# Altium PCB PI5_Robo_Board_PCB.PcbDoc (part 1 of 3)
Units mm, origin at the board's own origin, x right, y up, seen from the top; angles counter-clockwise.
Board outline 98.8 x 131.2 mm, 4 copper layers (TOP1, SIG2, SIG3, BOT4), stack 1.399 mm thick; 219 components, 149 nets, 779 pads, 462 vias.
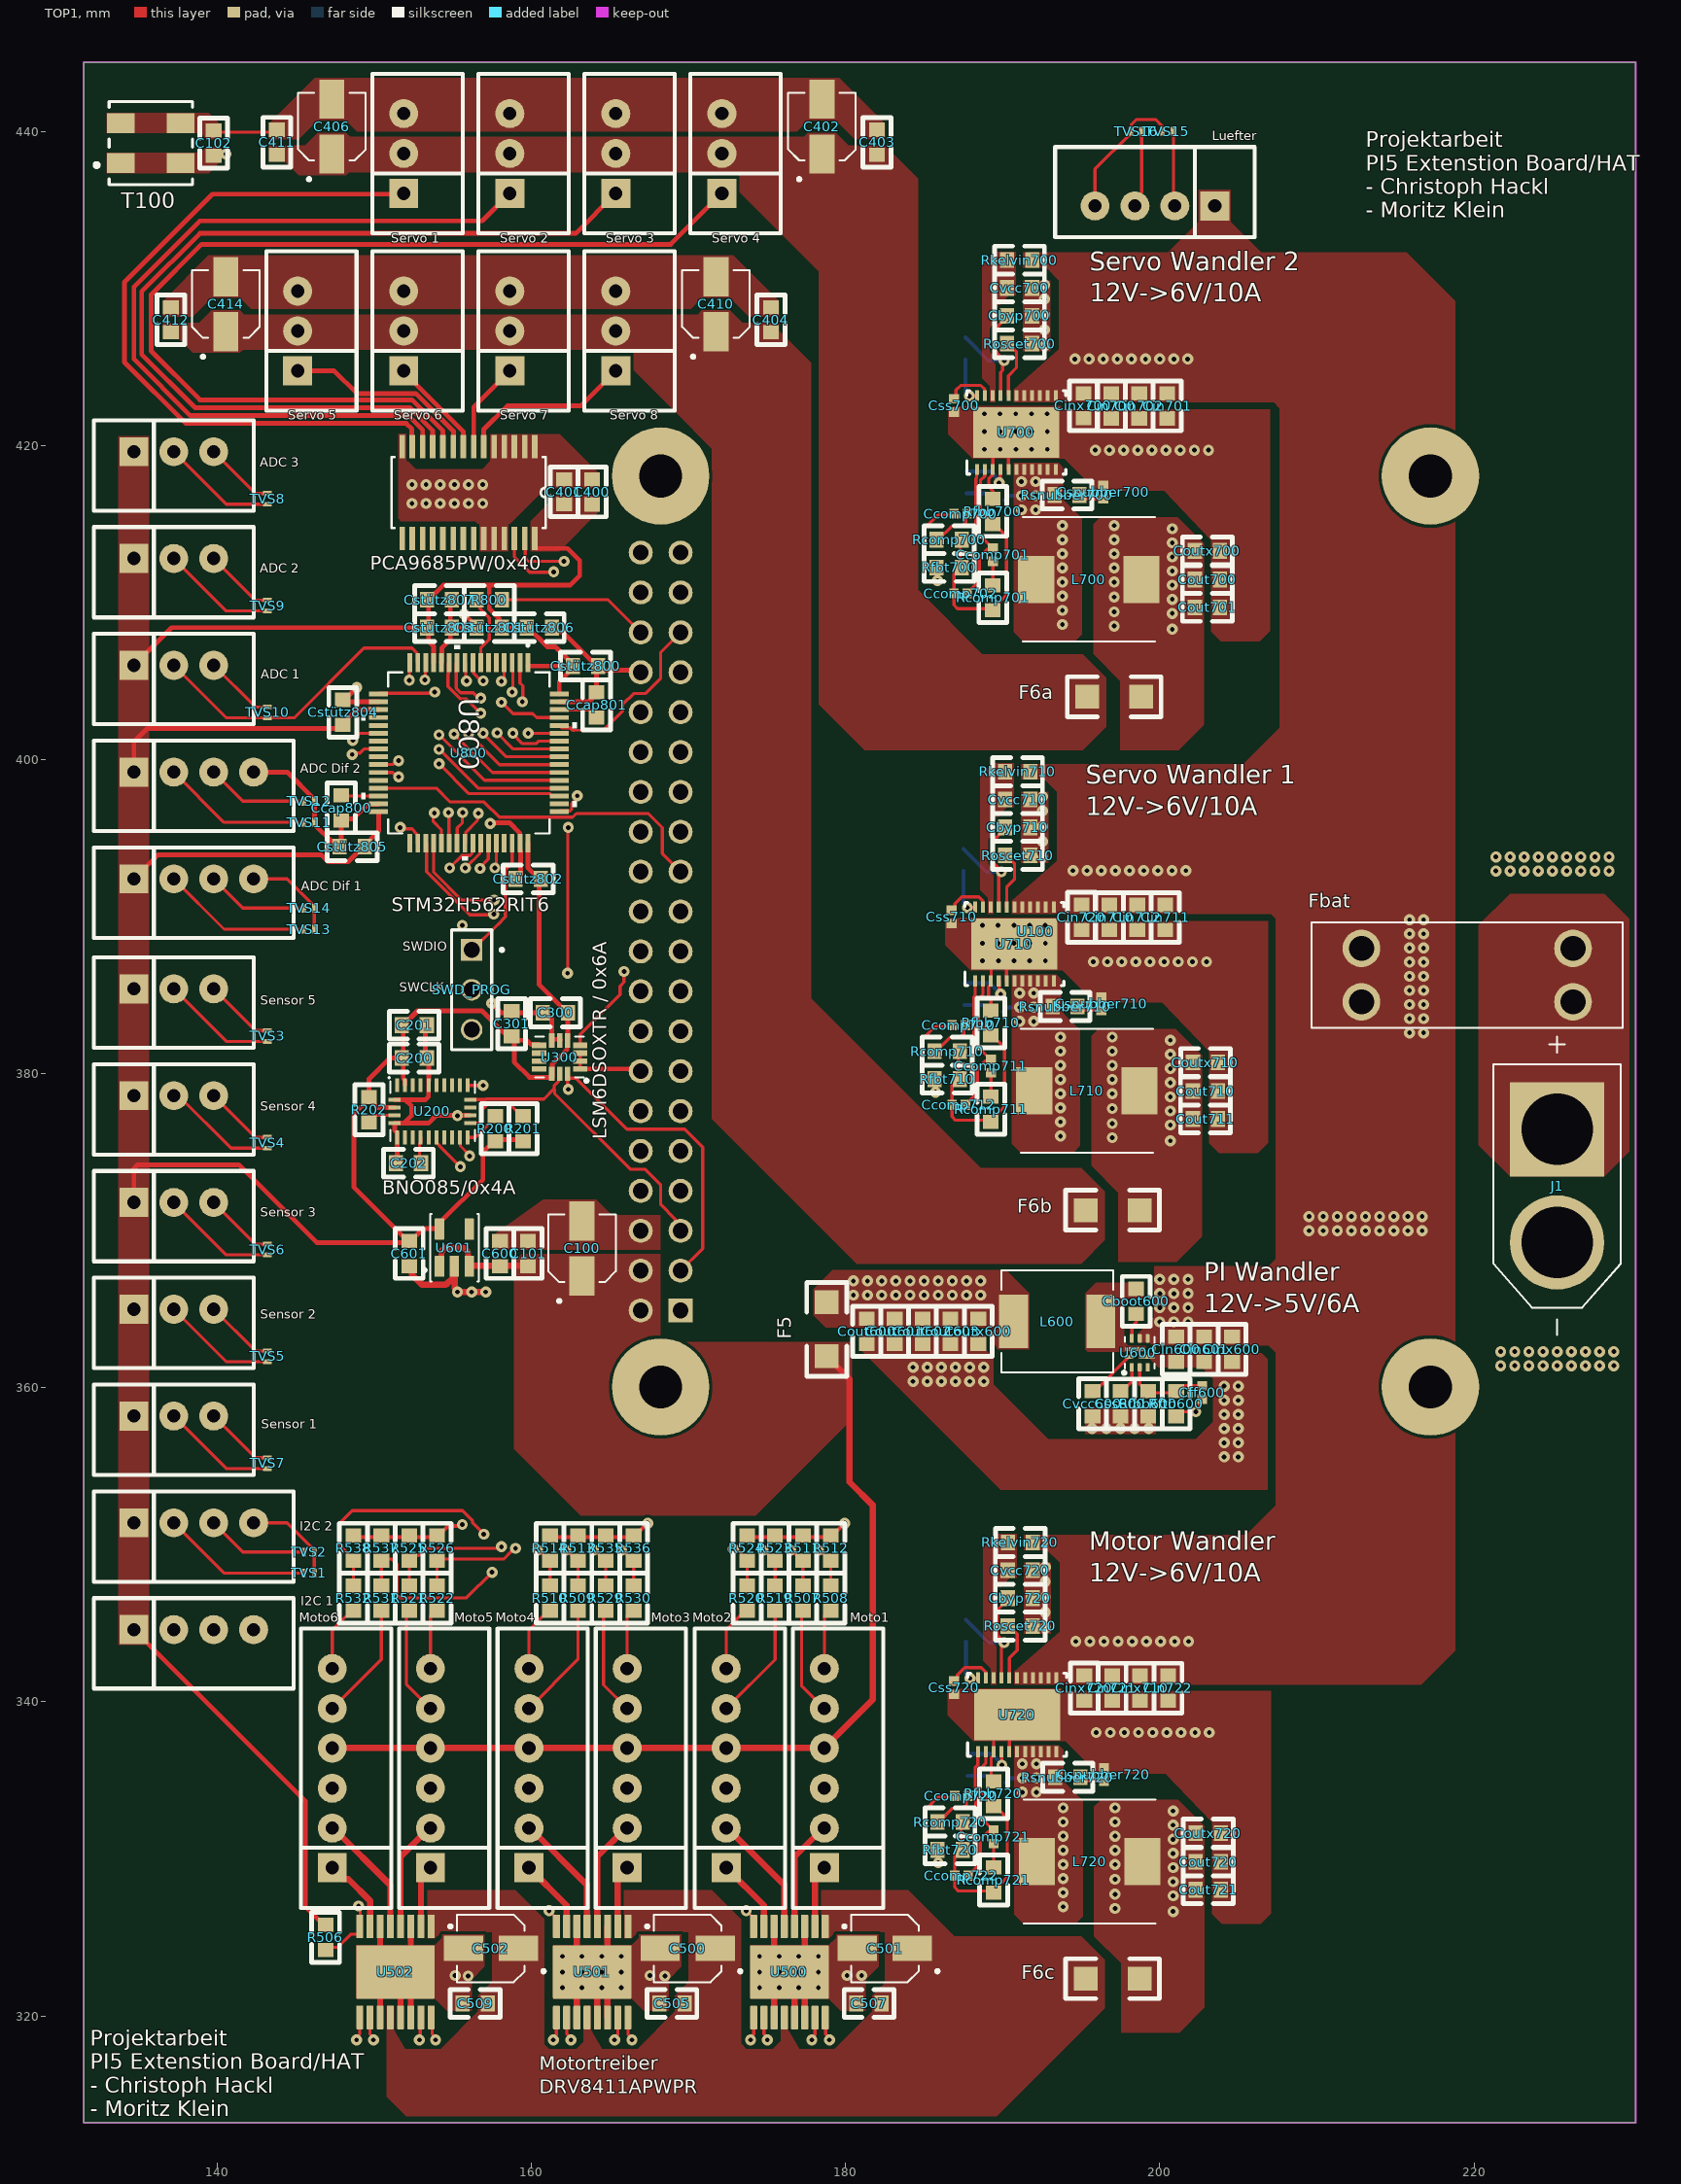
[diagram p0: TOP1 view]
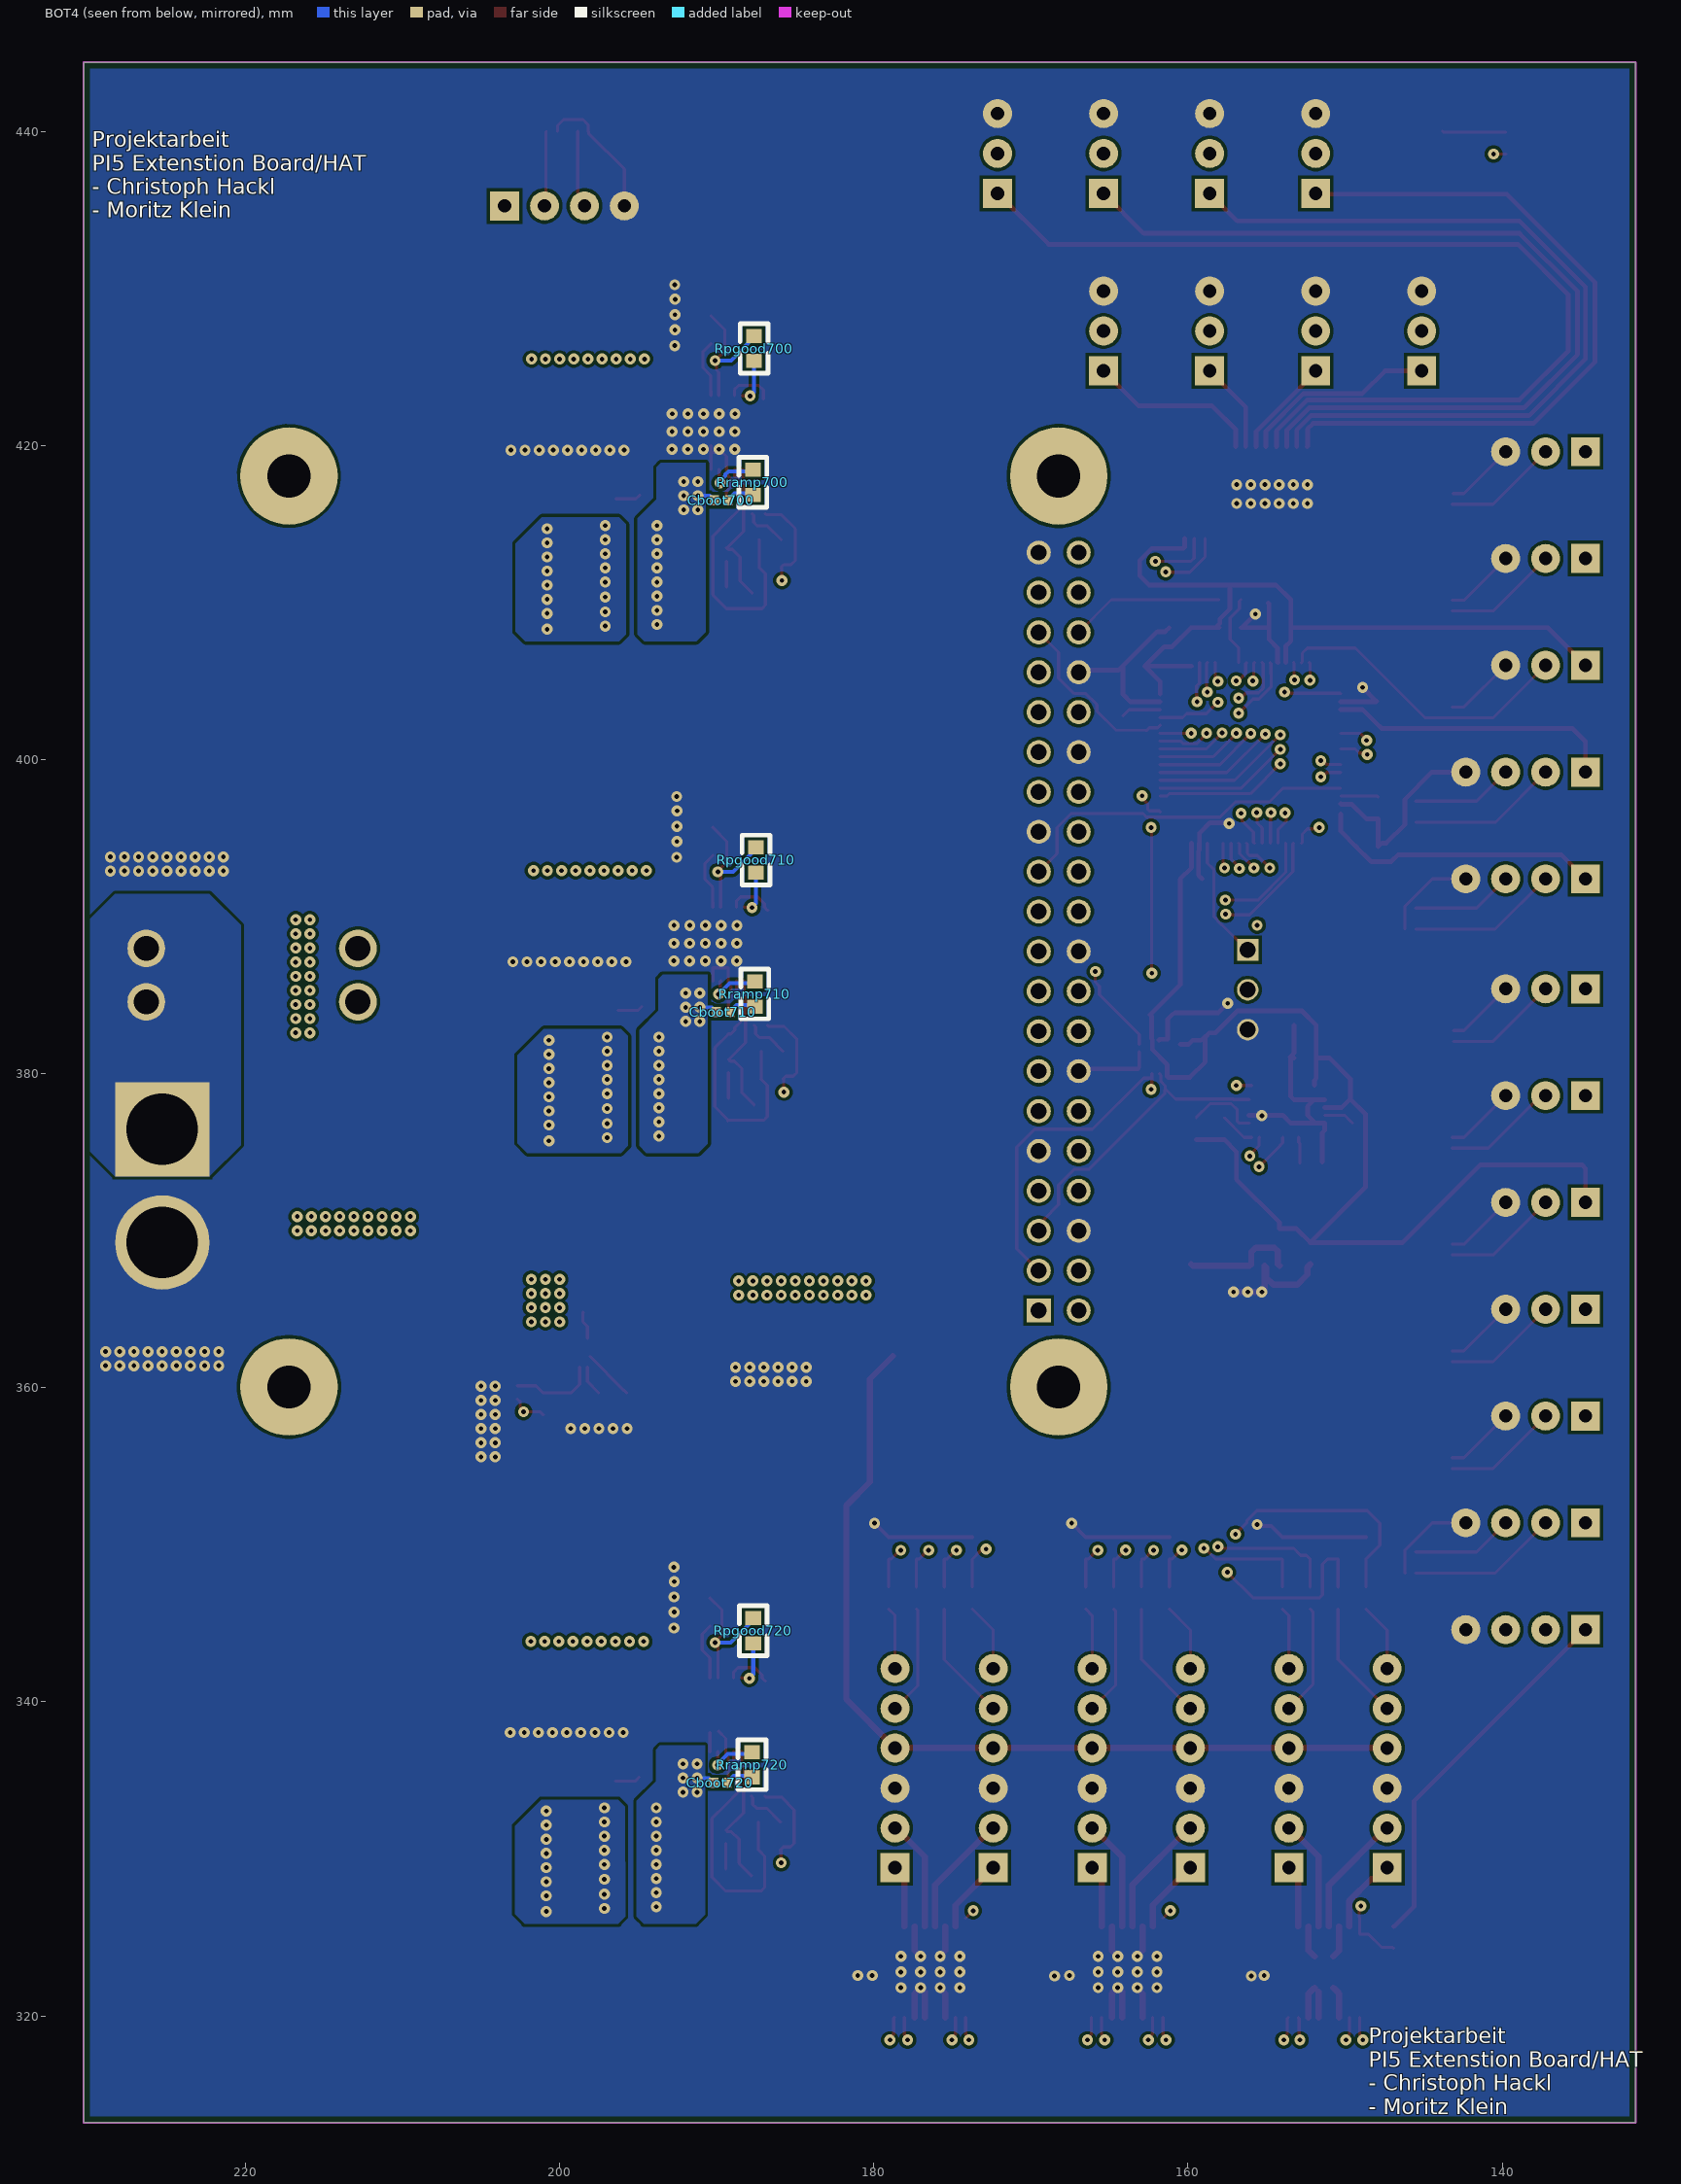
[diagram p1: BOT4 view, seen from below]
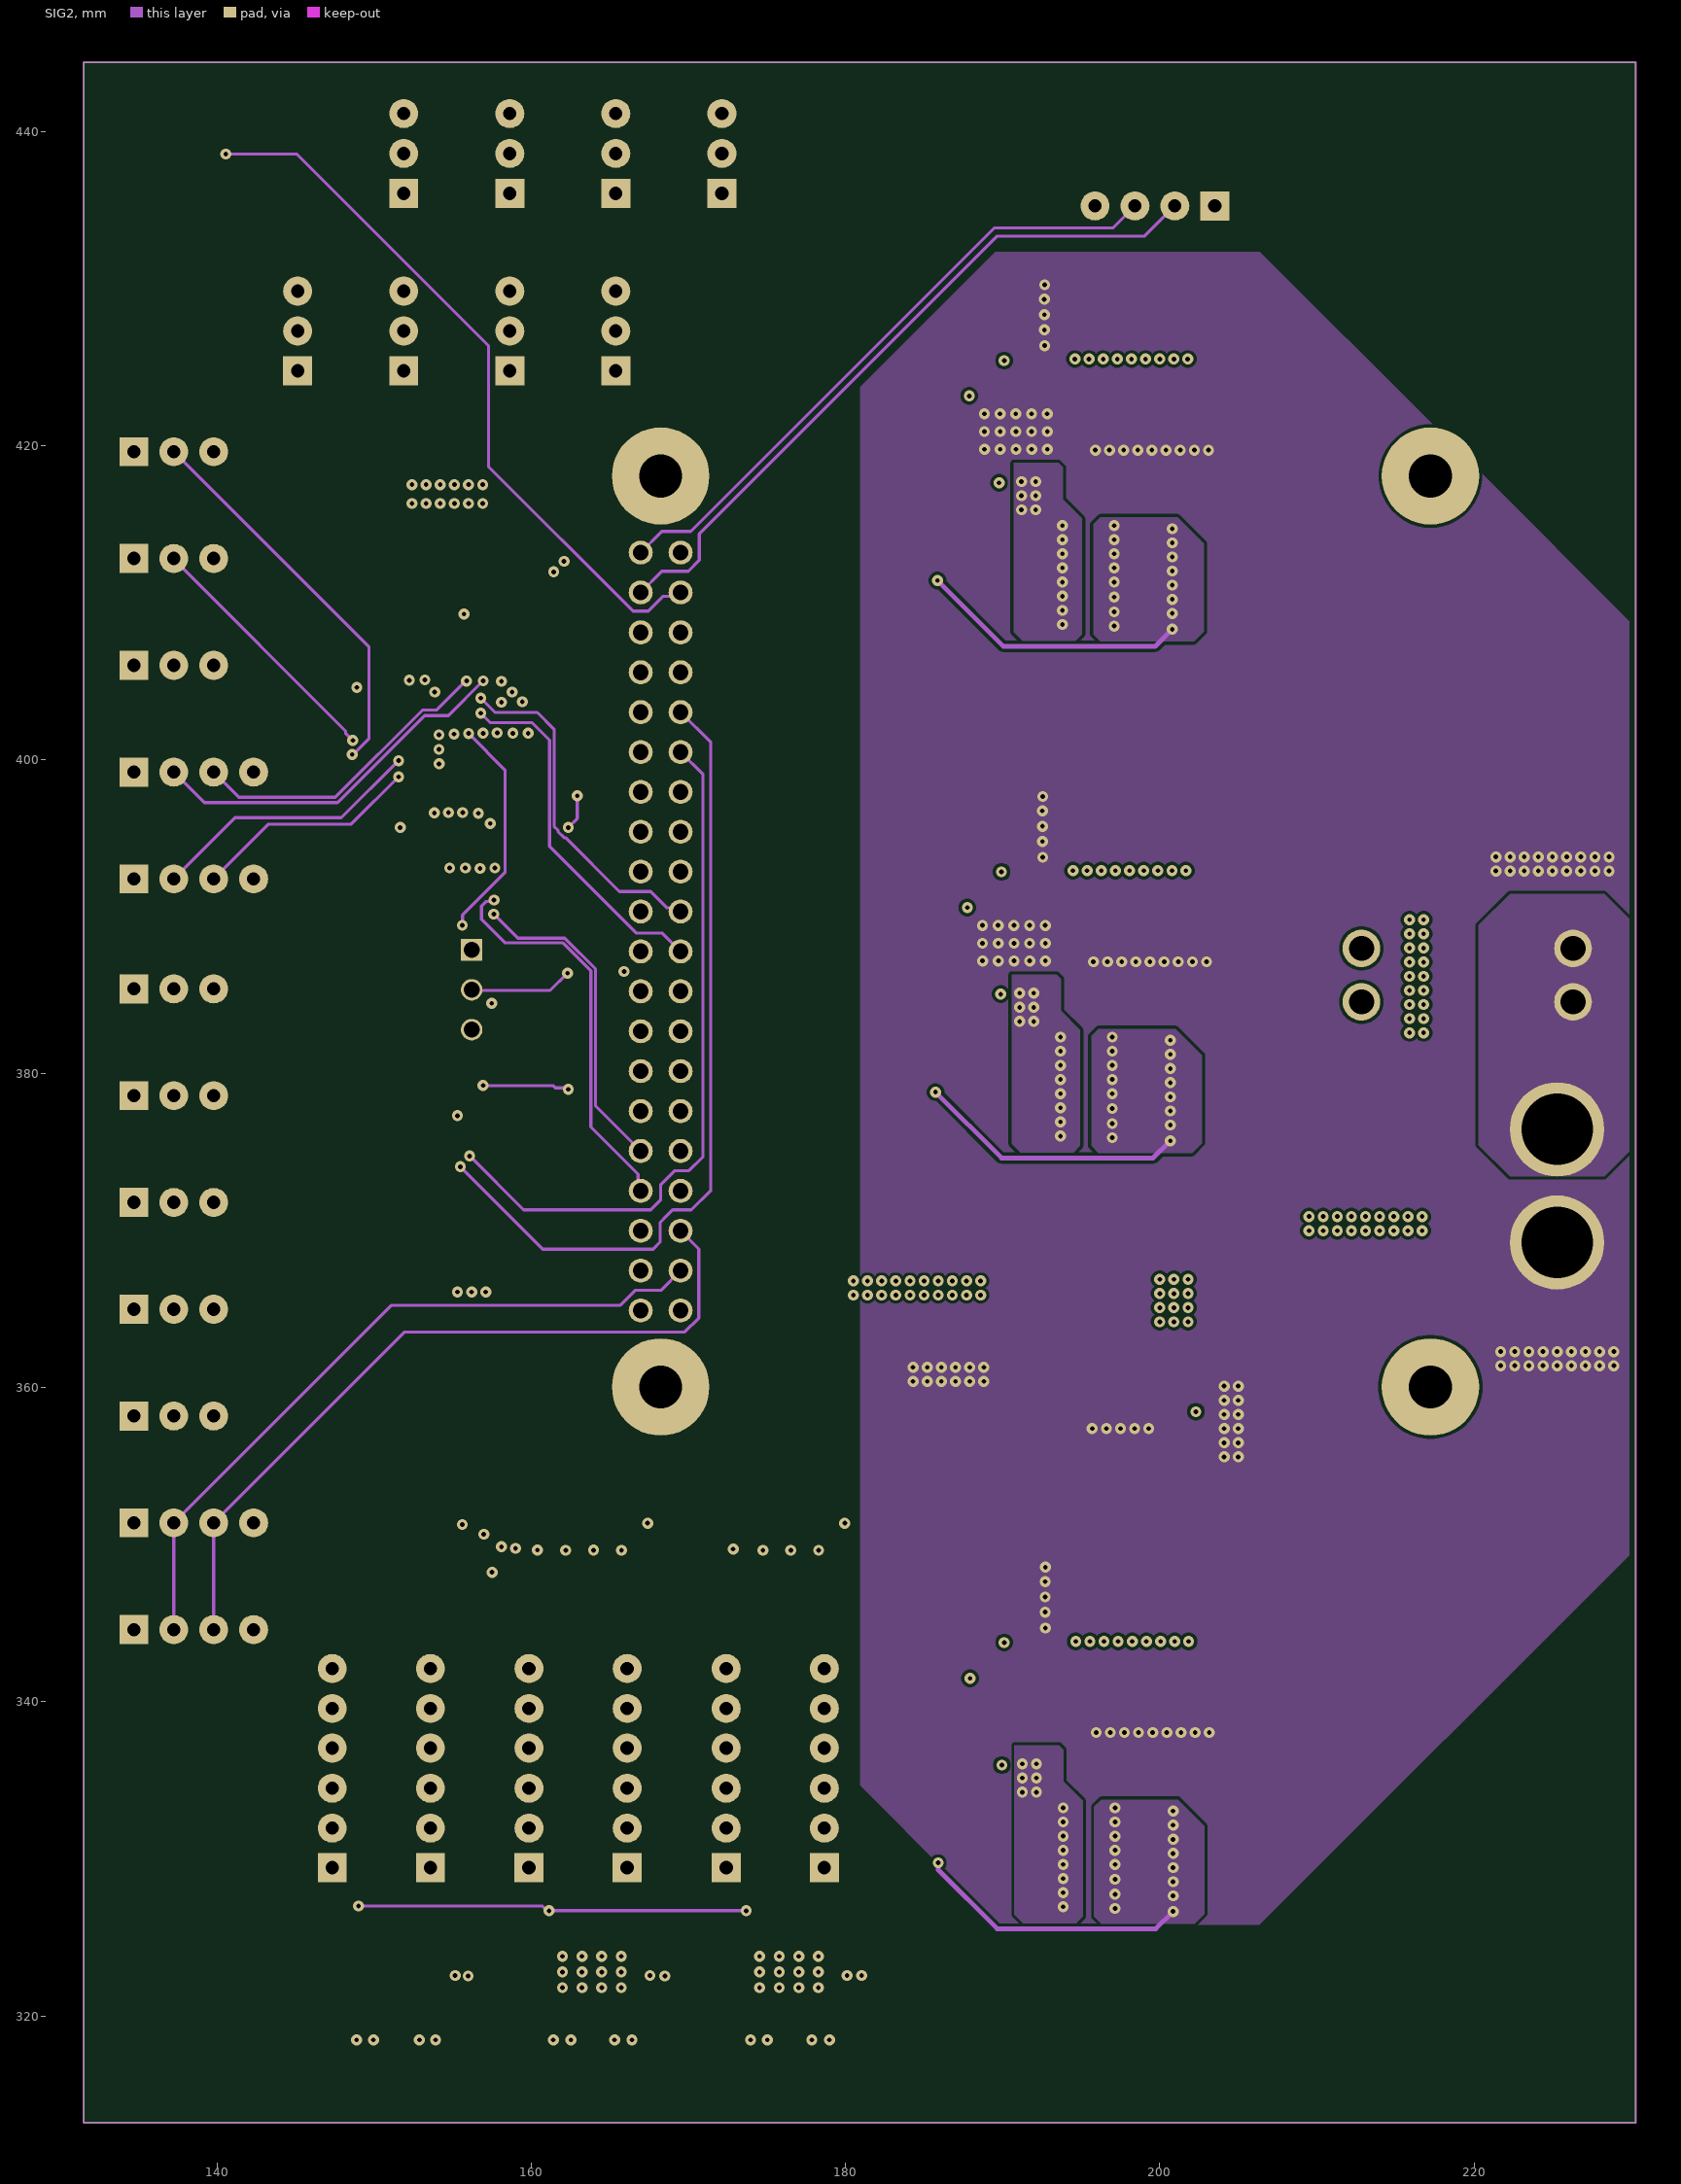
[diagram p2: SIG2]
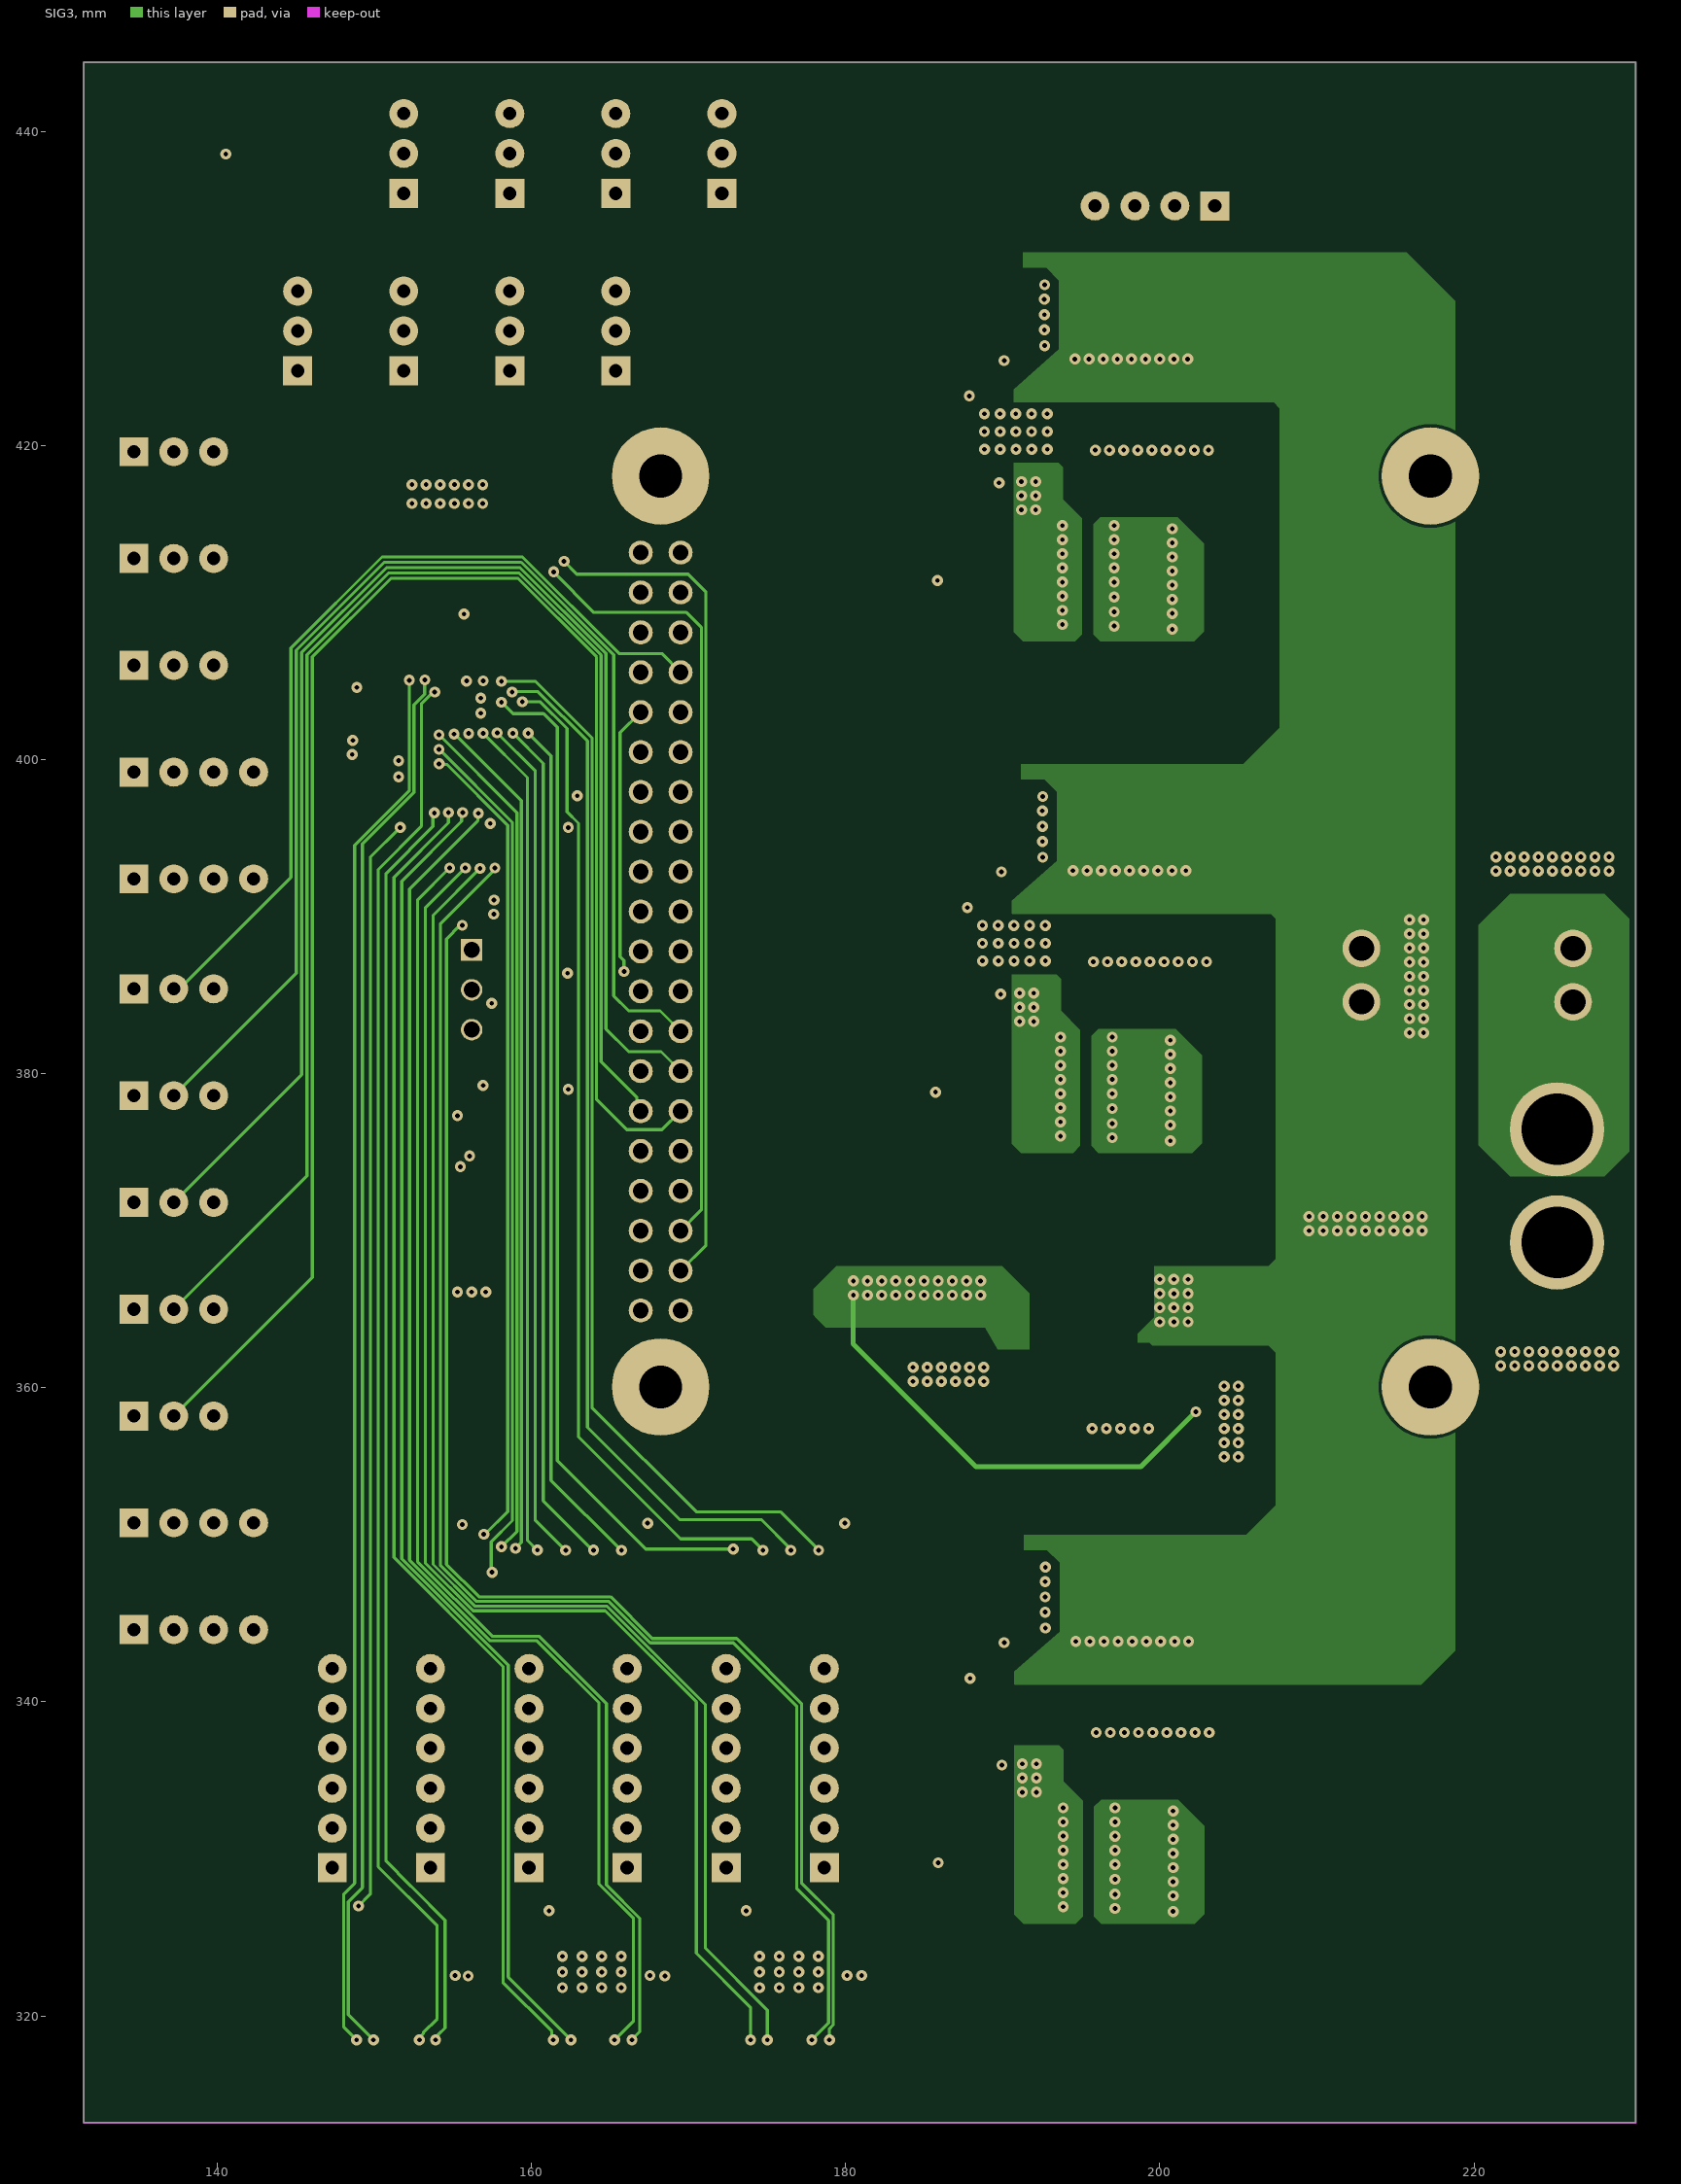
[diagram p3: SIG3]

## Layer stack, top to bottom
Top Solder: solder mask 0.0102, Solder Resist, Dk 3.5
TOP1: signal copper 0.035
Dielectric 1: prepreg 0.1168, PP-016, Dk 4.4
SIG2: signal copper 0.0152
Core: core 1.065, Core-042, Dk 4.6
SIG3: signal copper 0.0152
Dielectric 2: prepreg 0.1168, PP-016, Dk 4.4
BOT4: signal copper 0.035
Bottom Solder: solder mask 0.0102, Solder Resist, Dk 3.5

## Board outline
131.5,313.2 230.3,313.2 230.3,444.4 131.5,444.4

## Design rules (kind name [scope] priority, off if disabled: settings)
BoardOutlineClearance [All] p1: gap=0.4 ignorepadtopadclearanceinfootprint=FALSE
Clearance [All] p1: gap=0.2 ignorepadtopadclearanceinfootprint=FALSE except(0.09: Arc-Arc Arc-Track Track-Track; 0.1: Arc-SMDPad Track-SMDPad SMDPad-THPad THPad-THPad; 0.15: SMDPad-SMDPad; 0.25: Arc-Hole Track-Hole SMDPad-Hole Via-Hole Fill-Hole Poly-Hole Region-Hole Text-Hole; 0.3: Arc-THPad Track-THPad; 0.45: THPad-Hole)
ComponentClearance [All] p1 off: gap=0.089 collisioncheckmode=3 verticalgap=0.089 showdistances=TRUE
DiffPairsRouting [All] p1: maxlimit=0.1 minlimit=0.1 mostfreqgap=0.1 toplayer_minwidth=0.1 toplayer_maxwidth=1816.048 toplayer_prefwidth=0.1 midlayer1_minwidth=0.1 midlayer1_maxwidth=1816.048 midlayer1_prefwidth=0.1 midlayer2_minwidth=0.1 midlayer2_maxwidth=1816.048 midlayer2_prefwidth=0.1 bottomlayer_minwidth=0.1 bottomlayer_maxwidth=1816.048 bottomlayer_prefwidth=0.1 maxuncoupledlength=12.7
Height [All] p1: minheight=0 maxheight=1816.048 prefheight=12.7
HoleSize [All] p1: absolutevalues=TRUE maxlimit=6.3 minlimit=0.15 maxpercent=80.000 minpercent=20.000
HoleToHoleClearance [All] p1: gap=0.45 allowstackedmicrovias=FALSE
MinimumAnnularRing [All] p1: minimumring=0.2
MinimumSolderMaskSliver [All] p1: minsoldermaskwidth=0.1
PlaneClearance [All] p1: clearance=0.089
PlaneConnect PlaneConnectPowerPads [InPadClass('PowerPads')] p1: planeconnectstyle=Direct reliefexpansion=0.508 reliefentries=4 reliefconductorwidth=0.254 reliefairgap=0.254
PlaneConnect [All] p2: pad.planeconnectstyle=Relief pad.reliefexpansion=0.3 pad.reliefentries=4 pad.reliefconductorwidth=0.089 pad.reliefairgap=0.089 via.planeconnectstyle=Direct via.reliefexpansion=0.3 via.reliefentries=4 via.reliefconductorwidth=0.127 via.reliefairgap=0.127
PolygonConnect PolygonConnectPowerPads [All vs (InPadClass('PowerPads'))] p1: connectstyle=Direct reliefconductorwidth=0.254 reliefentries=4 polygonreliefangle="90 Angle" airgapwidth=0.254
PolygonConnect [All] p2: connectstyle=Direct reliefconductorwidth=0.089 reliefentries=4 polygonreliefangle="90 Angle" airgapwidth=0.089
RoutingVias [All] p1: holewidth=0.3 width=0.45 viastyle="Through Hole" minholewidth=0.3 minwidth=0.45 maxholewidth=6.3 maxwidth=6.55
SilkToSilkClearance [All] p1 off: silktosilkclearance=0
SilkToSolderMaskClearance [IsPad] p1: minsilkscreentomaskgap=0.15 clearancetoexposedcopper=TRUE
SolderMaskExpansion [All] p1: expansion=0.075 istentingtop=FALSE
SupplyNets "Schematic Supply Nets_5" [InNet('+6a')] p1: voltage=0.000
SupplyNets "Schematic Supply Nets_4" [InNet('GND')] p2: voltage=0.000
SupplyNets "Schematic Supply Nets_3" [InNet('+3.3')] p3: voltage=0.000
SupplyNets "Schematic Supply Nets_2" [InNet('+6b')] p4: voltage=0.000
SupplyNets "Schematic Supply Nets_1" [InNet('+5')] p5: voltage=0.000
SupplyNets "Schematic Supply Nets" [InNet('+6c')] p6: voltage=0.000
UnRoutedNet [All] p1: checkbadconnections=TRUE
Width [All] p1: maxlimit=1816.048 minlimit=0.09 preferedwidth=0.1
19 further rules are at their usual default settings.

## Classes and differential pairs
component class LSM6DSO: C300 C301 U300
component class BNO085: C200 C201 C202 R200 R201 R202 U200
component class Test_Sensor_Connectoren: "ADC 1" "ADC 2" "ADC 3" "ADC Dif 1" "ADC Dif 2" "ADC Diff 1" "ADC Diff 2" "ADC Sens 1" "ADC Sens 2" "ADC Sens 3" "DIG Sens 1" "DIG Sens 2" "DIG Sens 3" "DIG Sens 4" "I2C 1" "I2C 2" "Light Sensor" Luefter "Sensor 1" "Sensor 2" "Sensor 3" "Sensor 4" "Sensor 5" TVS1 TVS2 TVS3 TVS4 TVS5 TVS6 TVS7 TVS8 TVS9 TVS10 TVS11 TVS12 TVS13 TVS14 TVS15 TVS16
component class STM32: Ccap800 Ccap801 Cstütz800 Cstütz801 Cstütz802 Cstütz803 Cstütz804 Cstütz805 Cstütz806 Cstütz807 R800 SWD_PROG U800
component class Raspberry_PI5: C100 C101 C102 T100 U100
component class PCA9685: C400 C401 C402 C403 C404 C406 C410 C411 C412 C414 PCA9685PW/0x40 PCA/0x40 "Servo 1" "Servo 2" "Servo 3" "Servo 4" "Servo 5" "Servo 6" "Servo 7" "Servo 8"
component class DRV+Motor: C500 C501 C502 C505 C507 C509 Moto1 Moto2 Moto3 Moto4 Moto5 Moto6 R506 R507 R508 R509 R510 R511 R512 R513 R514 R519 R520 R521 R522 R523 R524 R525 R526 R529 R530 R531 R532 R535 R536 R537 R538 U500 U501 U502
component class 6b,_6c: Cboot710 Cboot720 Cbyp710 Cbyp720 Ccomp710 Ccomp711 Ccomp712 Ccomp720 Ccomp721 Ccomp722 Cin710 Cin711 Cin712 Cin720 Cin721 Cin722 Cinx710 Cinx720 Cout710 Cout711 Cout720 Cout721 Coutx710 Coutx720 Csnubber710 Csnubber720 Css710 Css720 Cvcc710 Cvcc720 F6b F6c L710 L720 Rcomp710 Rcomp711 Rcomp720 Rcomp721 Rfbb710 Rfbb720 Rfbt710 Rfbt720 Rkelvin710 Rkelvin720 Roscet710 Roscet720 Rpgood710 Rpgood720 Rramp710 Rramp720 Rsnubber710 Rsnubber720 U710 U720
component class 5V,_3V3,_6a,_Batt: C600 C601 Cboot600 Cboot700 Cbyp700 Ccomp700 Ccomp701 Ccomp702 Cff600 Cin600 Cin601 Cin700 Cin701 Cin702 Cinx600 Cinx700 Cout600 Cout601 Cout602 Cout603 Cout700 Cout701 Coutx600 Coutx700 Csnubber700 Css600 Css700 Cvcc600 Cvcc700 F5 F6a Fbat J1 L600 L700 Rcomp700 Rcomp701 Rfbb600 Rfbb700 Rfbt700 Rftb600 Rkelvin700 Roscet700 Rpgood700 Rramp700 Rsnubber700 U600 U601 U700

## Components (designator, comment, footprint, x,y, rotation, side; value= is the part's Value field where it differs from the comment)
"ADC 1" "JST-XH" Sip-3 134.7,406 r0 top (schematic designator "ADC Sens 1")
"ADC 2" "JST-XH" Sip-3 134.7,412.8 r0 top (schematic designator "ADC Sens 2")
"ADC 3" "JST-XH" Sip-3 134.7,419.6 r0 top (schematic designator "ADC Sens 3")
"ADC Dif 1" "JST-XH" Sip-4 134.7,392.4 r0 top (schematic designator "ADC Diff 1")
"ADC Dif 2" "JST-XH" Sip-4 134.7,399.2 r0 top (schematic designator "ADC Diff 2")
C100 "ELKO" CAP_EEEFN1A220R 163.225,368.875 r90 top value=22uF
C101 "0603" 0603 159.788,368.552 r270 top value=100nF
C102 "0603" 0603 139.775,439.25 r90 top value=100nF
C200 "0603" 0603 152.545,380.989 r0 top value=100nF
C201 "0603" 0603 152.545,383.089 r0 top value=4.7uF
C202 "0603" 0603 152.175,374.3 r180 top value=100nF
C300 "0603" 0603 161.532,383.877 r180 top value=100nF
C301 "0603" 0603 158.745,383.18 r90 top value=100nF
C400 "0603" 0603 163.864,417.042 r270 top value=100nF
C401 "0603" 0603 162.089,417.044 r270 top value=4.7uF
C402 "ELKO" CAP_EEEFN1A220R 178.5,440.3 r90 top value=22uF
C403 "0603" 0603 182,439.298 r270 top value=100nF
C404 "0603" 0603 175.25,428 r270 top value=100nF
C406 "ELKO" CAP_EEEFN1A220R 147.3,440.3 r90 top value=22uF
C410 "ELKO" CAP_EEEFN1A220R 171.75,429 r90 top value=22uF
C411 "0603" 0603 143.8,439.3 r270 top value=100nF
C412 "0603" 0603 137.05,427.999 r270 top value=100nF
C414 "ELKO" CAP_EEEFN1A220R 140.55,429 r90 top value=22uF
C500 "ELKO" CAP_EEEFN1A220R 169.95,324.3 r180 top value=22uF
C501 "ELKO" CAP_EEEFN1A220R 182.5,324.3 r180 top value=22uF
C502 "ELKO" CAP_EEEFN1A220R 157.425,324.3 r180 top value=22uF
C505 "0603" 0603 168.948,320.8 r0 top value=100nF
C507 "0603" 0603 181.498,320.8 r0 top value=100nF
C509 "0603" 0603 156.423,320.8 r0 top value=100nF
C600 "0603" 0603 158,368.55 r270 top value=1uF
C601 "0603" 0603 152.225,368.55 r90 top value=1uF
Cboot600 "1% 0603" 0603 198.5,365.498 r90 top value=100nF
Cboot700 "1% 0402" CAPC1005X61N 189.725,416.5 r180 bottom value=100nF
Cboot710 "1% 0402" CAPC1005X61N 189.602,383.925 r180 bottom value=100nF
Cboot720 "1% 0402" CAPC1005X61N 189.777,334.85 r180 bottom value=100nF
Cbyp700 "1% 0603" 0603 191.072,428.25 r0 top value=4.7uF
Cbyp710 "1% 0603" 0603 190.948,395.675 r0 top value=4.7uF
Cbyp720 "1% 0603" 0603 191.124,346.6 r0 top value=4.7uF
Ccap800 "0603" 0603 147.9,396.927 r90 top value=2.2uF
Ccap801 "0603" 0603 164.15,403.475 r270 top value=2.2uF
Ccomp700 "1% 0402" CAPC1005X61N 187.323,415.652 r180 top value=1nF
Ccomp701 "1% 0402" CAPC1005X61N 189.373,413.052 r270 top value=2.2nF
Ccomp702 "1% 0402" CAPC1005X61N 187.323,410.577 r180 top value=10pF
Ccomp710 "1% 0402" CAPC1005X61N 187.2,383.077 r180 top value=1nF
Ccomp711 "1% 0402" CAPC1005X61N 189.25,380.477 r270 top value=2.2nF
Ccomp712 "1% 0402" CAPC1005X61N 187.2,378.002 r180 top value=10pF
Ccomp720 "1% 0402" CAPC1005X61N 187.375,334.001 r180 top value=1nF
Ccomp721 "1% 0402" CAPC1005X61N 189.425,331.401 r270 top value=2.2nF
Ccomp722 "1% 0402" CAPC1005X61N 187.375,328.926 r180 top value=10pF
Cff600 "1% 0402" CAPC1005X61N 202.7,359.7 r90 top value=33pF
Cin600 "1% 0603" 0603 201.05,362.452 r90 top value=22uF
Cin601 "1% 0603" 0603 202.825,362.45 r90 top value=22uF
Cin700 "1% 0603" 0603 196.918,422.518 r270 top value=10uF
Cin701 "1% 0603" 0603 200.474,422.518 r270 top value=10uF
Cin702 "1% 0603" 0603 198.696,422.518 r270 top value=10uF
Cin710 "1% 0603" 0603 196.794,389.943 r270 top value=10uF
Cin711 "1% 0603" 0603 200.35,389.943 r270 top value=10uF
Cin712 "1% 0603" 0603 198.572,389.943 r270 top value=10uF
Cin720 "1% 0603" 0603 195.025,389.95 r270 top value=10uF
Cin721 "1% 0603" 0603 196.97,340.868 r270 top value=10uF
Cin722 "1% 0603" 0603 200.526,340.868 r270 top value=10uF
Cinx600 "1% 0603" 0603 204.6,362.45 r90 top value=100nF
Cinx700 "1% 0603" 0603 195.148,422.525 r270 top value=1uF
Cinx710 "1% 0603" 0603 198.748,340.868 r270 top value=1uF
Cinx720 "1% 0603" 0603 195.2,340.875 r270 top value=1uF
Cout600 "1% 0603" 0603 181.35,363.594 r270 top value=22uF
Cout601 "1% 0603" 0603 183.125,363.593 r270 top value=22uF
Cout602 "1% 0603" 0603 184.9,363.593 r270 top value=22uF
Cout603 "1% 0603" 0603 186.675,363.593 r270 top value=22uF
Cout700 "1% 0603" 0603 203.035,411.463 r0 top value=47uF
Cout701 "1% 0603" 0603 203.035,409.688 r0 top value=47uF
Cout710 "1% 0603" 0603 202.912,378.888 r0 top value=47uF
Cout711 "1% 0603" 0603 202.912,377.113 r0 top value=47uF
Cout720 "1% 0603" 0603 203.087,329.812 r0 top value=47uF
Cout721 "1% 0603" 0603 203.087,328.037 r0 top value=47uF
Coutx600 "1% 0603" 0603 188.45,363.593 r270 top value=100nF
Coutx700 "1% 0603" 0603 203.037,413.288 r0 top value=22uF
Coutx710 "1% 0603" 0603 202.914,380.713 r0 top value=22uF
Coutx720 "1% 0603" 0603 203.089,331.638 r0 top value=22uF
Csnubber700 "1% 0402" CAPC1005X61N 196.398,417.025 r270 top value=2.2nF
Csnubber710 "1% 0402" CAPC1005X61N 196.275,384.45 r270 top value=2.2nF
Csnubber720 "1% 0402" CAPC1005X61N 196.45,335.375 r270 top value=2.2nF
Css600 "1% 0603" 0603 197.5,358.973 r270 top value=1uF
Css700 "1% 0402" CAPC1005X61N 186.9,422.55 r90 top value=15nF
Css710 "1% 0402" CAPC1005X61N 186.75,389.975 r90 top value=15nF
Css720 "1% 0402" CAPC1005X61N 186.9,340.9 r90 top value=15nF
Cstütz800 "0603" 0603 163.45,405.95 r180 top value=100nF
Cstütz801 "0603" 0603 157.323,408.4 r0 top value=100nF
Cstütz802 "0603" 0603 159.8,392.4 r0 top value=100nF
Cstütz803 "0603" 0603 154.148,408.4 r180 top value=100nF
Cstütz804 "0603" 0603 148,403.001 r270 top value=100nF
Cstütz805 "0603" 0603 148.598,394.45 r0 top value=100nF
Cstütz806 "0603" 0603 160.5,408.4 r180 top value=4.7uF
Cstütz807 "0603" 0603 154.15,410.175 r180 top value=1uF
Cvcc600 "1% 0603" 0603 195.725,358.975 r270 top value=10nF
Cvcc700 "1% 0603" 0603 191.071,430.025 r0 top value=1uF
Cvcc710 "1% 0603" 0603 190.948,397.45 r0 top value=1uF
Cvcc720 "1% 0603" 0603 191.123,348.375 r0 top value=1uF
F5 "SMD Fuse" 1206 178.8,363.725 r270 top
F6a "SMD Fuse" 1206 197.1,404 r180 top
F6b "SMD Fuse" 1206 197,371.3 r180 top
F6c "SMD Fuse" 1206 197,322.375 r180 top
Fbat "3557-15" FUSE_3557-15 219.575,386.275 r180 top
"I2C 1" "JST-XH" Sip-4 134.7,344.6 r0 top
"I2C 2" "JST-XH" Sip-4 134.7,351.4 r0 top
J1 "XT60-M" AMASS_XT60-M 225.292,372.85 r270 top
L600 "Spule" IND_SPM6530T-1R5M100 193.475,364.225 r180 top value=1.5uH
L700 "" WE-HCC_807021 195.485,411.475 r0 top
L710 "" WE-HCC_807021 195.362,378.9 r0 top
L720 "" WE-HCC_807021 195.537,329.825 r0 top
Luefter "JST-XH" Sip-4 203.5,435.25 r180 top
Moto1 "JST-XH" SIP-6 178.65,329.44 r90 top
Moto2 "JST-XH" SIP-6 172.4,329.44 r90 top
Moto3 "JST-XH" SIP-6 166.1,329.44 r90 top
Moto4 "JST-XH" SIP-6 159.85,329.44 r90 top
Moto5 "JST-XH" SIP-6 153.575,329.44 r90 top
Moto6 "JST-XH" SIP-6 147.325,329.44 r90 top
PCA9685PW/0x40 "PCA9685PW,112" SOP65P640X110-28N 156,417 r270 top (schematic designator PCA/0x40)
R200 "0603" 0603 157.7,376.5 r270 top value=2.2k
R201 "0603" 0603 159.475,376.5 r270 top value=2.2k
R202 "0603" 0603 149.666,377.697 r90 top value=10k
R506 "0603" 0603 146.9,324.998 r90 top value=10k
R507 "0603" 0603 177.286,346.61 r90 top value=10k
R508 "0603" 0603 179.061,346.61 r90 top value=10k
R509 "0603" 0603 162.961,346.61 r90 top value=10k
R510 "0603" 0603 161.186,346.61 r90 top value=10k
R511 "0603" 0603 177.286,349.783 r270 top value=20k
R512 "0603" 0603 179.061,349.783 r270 top value=20k
R513 "0603" 0603 162.961,349.783 r270 top value=20k
R514 "0603" 0603 161.186,349.783 r270 top value=20k
R519 "0603" 0603 175.51,346.61 r90 top value=10k
R520 "0603" 0603 173.735,346.61 r90 top value=10k
R521 "0603" 0603 152.225,346.61 r90 top value=10k
R522 "0603" 0603 154,346.61 r90 top value=10k
R523 "0603" 0603 175.51,349.783 r270 top value=20k
R524 "0603" 0603 173.735,349.783 r270 top value=20k
R525 "0603" 0603 152.225,349.783 r270 top value=20k
R526 "0603" 0603 154,349.783 r270 top value=20k
R529 "0603" 0603 164.739,346.61 r90 top value=10k
R530 "0603" 0603 166.514,346.61 r90 top value=10k
R531 "0603" 0603 150.45,346.61 r90 top value=10k
R532 "0603" 0603 148.675,346.61 r90 top value=10k
R535 "0603" 0603 164.739,349.783 r270 top value=20k
R536 "0603" 0603 166.514,349.783 r270 top value=20k
R537 "0603" 0603 150.45,349.783 r270 top value=20k
R538 "0603" 0603 148.675,349.783 r270 top value=20k
R800 "0603" 0603 157.325,410.175 r180 top value=1k
Rcomp700 "1% 0603" 0603 186.596,414.001 r0 top value=1k
Rcomp701 "1% 0603" 0603 189.373,410.303 r270 top value=11.3k
Rcomp710 "1% 0603" 0603 186.473,381.426 r0 top value=1k
Rcomp711 "1% 0603" 0603 189.25,377.728 r270 top value=11.3k
Rcomp720 "1% 0603" 0603 186.648,332.351 r0 top value=1k
Rcomp721 "1% 0603" 0603 189.425,328.653 r270 top value=11.3k
Rfbb600 "1% 0603" 0603 199.275,358.973 r90 top value=30k
Rfbb700 "1% 0603" 0603 189.373,415.802 r270 top value=2.7k
Rfbb710 "1% 0603" 0603 189.25,383.227 r270 top value=2.7k
Rfbb720 "1% 0603" 0603 189.425,334.151 r270 top value=2.7k
Rfbt700 "1% 0603" 0603 186.598,412.227 r180 top value=24.3k
Rfbt710 "1% 0603" 0603 186.475,379.652 r180 top value=24.3k
Rfbt720 "1% 0603" 0603 186.65,330.576 r180 top value=24.3k
Rftb600 "1% 0603" 0603 201.05,358.975 r270 top value=220k
Rkelvin700 "1% 0603" 0603 191.073,431.8 r0 top value=0Ohm
Rkelvin710 "1% 0603" 0603 190.95,399.225 r0 top value=0Ohm
Rkelvin720 "1% 0603" 0603 191.125,350.15 r0 top value=0Ohm
Roscet700 "1% 0603" 0603 191.072,426.475 r0 top value=1.21k
Roscet710 "1% 0603" 0603 190.948,393.9 r0 top value=1.21k
Roscet720 "1% 0603" 0603 191.124,344.825 r0 top value=1.21k
Rpgood700 "1% 0603" 0603 187.623,426.174 r270 bottom value=100k
Rpgood710 "1% 0603" 0603 187.5,393.599 r270 bottom value=100k
Rpgood720 "1% 0603" 0603 187.675,344.524 r270 bottom value=100k
Rramp700 "1% 0603" 0603 187.698,417.65 r270 bottom value=1Ohm
Rramp710 "1% 0603" 0603 187.575,385.075 r270 bottom value=1Ohm
Rramp720 "1% 0603" 0603 187.75,336 r270 bottom value=1Ohm
Rsnubber700 "1% 0603" 0603 194.098,416.85 r180 top value=1Ohm
Rsnubber710 "1% 0603" 0603 193.975,384.275 r180 top value=1Ohm
Rsnubber720 "1% 0603" 0603 194.15,335.2 r180 top value=1Ohm
"Sensor 1" "JST-XH" Sip-3 134.7,358.2 r0 top (schematic designator "DIG Sens 1")
"Sensor 2" "JST-XH" Sip-3 134.7,365 r0 top (schematic designator "DIG Sens 3")
"Sensor 3" "JST-XH" Sip-3 134.7,371.8 r0 top (schematic designator "DIG Sens 2")
"Sensor 4" "JST-XH" Sip-3 134.7,378.6 r0 top (schematic designator "DIG Sens 4")
"Sensor 5" "JST-XH" Sip-3 134.7,385.4 r0 top (schematic designator "Light Sensor")
"Servo 1" "JST-XH" Sip-3 151.875,436.05 r90 top
"Servo 2" "JST-XH" Sip-3 158.625,436.05 r90 top
"Servo 3" "JST-XH" Sip-3 165.375,436.05 r90 top
"Servo 4" "JST-XH" Sip-3 172.125,436.05 r90 top
"Servo 5" "JST-XH" Sip-3 145.125,424.745 r90 top
"Servo 6" "JST-XH" Sip-3 151.875,424.745 r90 top
"Servo 7" "JST-XH" Sip-3 158.625,424.745 r90 top
"Servo 8" "JST-XH" Sip-3 165.375,424.745 r90 top
SWD_PROG "TSW-101-23-G-T" SAMTEC_TSW-101-23-G-T 156.2,387.88 r180 top
T100 "7914J-1-032" FP-7914J-1-032-MFG 135.775,439.25 r90 top
TVS1 "DRTR5V0U1LPQ-7B" X1-DFN1006-2_P6X1_DIO 145.843,348.2 r180 top
TVS2 "DRTR5V0U1LPQ-7B" X1-DFN1006-2_P6X1_DIO 145.847,349.539 r180 top
TVS3 "DRTR5V0U1LPQ-7B" X1-DFN1006-2_P6X1_DIO 143.2,382.4 r270 top
TVS4 "DRTR5V0U1LPQ-7B" X1-DFN1006-2_P6X1_DIO 143.2,375.6 r270 top
TVS5 "DRTR5V0U1LPQ-7B" X1-DFN1006-2_P6X1_DIO 143.2,362 r270 top
TVS6 "DRTR5V0U1LPQ-7B" X1-DFN1006-2_P6X1_DIO 143.2,368.8 r270 top
TVS7 "DRTR5V0U1LPQ-7B" X1-DFN1006-2_P6X1_DIO 143.2,355.2 r270 top
TVS8 "DRTR5V0U1LPQ-7B" X1-DFN1006-2_P6X1_DIO 143.2,416.6 r270 top
TVS9 "DRTR5V0U1LPQ-7B" X1-DFN1006-2_P6X1_DIO 143.2,409.8 r270 top
TVS10 "DRTR5V0U1LPQ-7B" X1-DFN1006-2_P6X1_DIO 143.2,403 r270 top
TVS11 "DRTR5V0U1LPQ-7B" X1-DFN1006-2_P6X1_DIO 145.843,396 r180 top
TVS12 "DRTR5V0U1LPQ-7B" X1-DFN1006-2_P6X1_DIO 145.849,397.347 r180 top
TVS13 "DRTR5V0U1LPQ-7B" X1-DFN1006-2_P6X1_DIO 145.845,389.197 r180 top
TVS14 "DRTR5V0U1LPQ-7B" X1-DFN1006-2_P6X1_DIO 145.847,390.541 r180 top
TVS15 "DRTR5V0U1LPQ-7B" X1-DFN1006-2_P6X1_DIO 200.5,440 r0 top
TVS16 "DRTR5V0U1LPQ-7B" X1-DFN1006-2_P6X1_DIO 198.5,440 r0 top
U100 "Raspberry Pi 5" MODULE_SC0195(9) 192.73,399.05 r90 top
U200 "BNO085/0x4A" IC_BNO085 153.708,377.596 r0 top
U300 "LSM6DSOXTR / 0x6A" PQFN50P250X300X86-14N 161.8,381.054 r180 top
U500 "DRV8411APWPR" IC_DRV8411APWPR 176.425,322.8 r270 top
U501 "DRV8411APWPR" IC_DRV8411APWPR 163.875,322.8 r270 top
U502 "DRV8411APWPR" IC_DRV8411APWPR 151.35,322.8 r270 top
U600 "TPS566231RQFR" IC_TPS566231RQFR 198.725,362.225 r90 top
U601 "AP2112K-3.3TRG1" SOT95P285X140-5N 155.101,368.918 r90 top
U700 "TPS56121DQPR" DQP0022A 190.873,420.825 r90 top
U710 "TPS56121DQPR" DQP0022A 190.75,388.25 r90 top
U720 "TPS56121DQPR" DQP0022A 190.925,339.175 r90 top
U800 "STM32H562RIT6" LQFP64-10x10mm_STM 156.025,400.425 r270 top

## Footprints (in the part's own frame and the unit in brackets; to place one, negate y for a bottom-side part, rotate by r counter-clockwise, add the part's x,y. Pads: shape width x height; smd on the part's side, far side on the other; paste and mask are expansions set on the pad)
0603 [mm]
  rect 0.9x1 smd: 1(-0.8,0) 2(0.8,0)
  silkscreen extent -1.59,-0.89 1.59,0.89, body extent -0.87,-0.48 0.88,0.47, height 1
1206 [mil]
  rect 60x60 smd: 1(-67.5,0) 2(67.5,0)
  silkscreen extent -118,-50 118,50, body extent -108,-57 108,57, height 10
AMASS_XT60-M [mm]
  round 6 hole 4.55: N(3.6,0)
  rect 6x6 / inner round 6 / far side rect 6x6 hole 4.55: P(-3.6,0)
  silkscreen extent -9.5,-4.05 9.5,4.05, body extent -7.75,-4.05 7.75,4.05, height 16
CAP_EEEFN1A220R [mm]
  rect 2.5x1.6 smd: 1(-1.75,0) 2(1.75,0)
  silkscreen extent -3.45,-2.15 2.15,2.15, body extent -2.5,-2.15 2.5,2.15, height 5.3
CAPC1005X61N [mm]
  rect 0.6x0.64 smd: 1(-0.426,0) 2(0.426,0)
  body extent -0.5,-0.26 0.5,0.24, height 0.56
DQP0022A [mm]
  rect 0.7x0.25 smd paste+0 mask+0.051: 1(-2.35,2.5) 2(-2.35,2) 3(-2.35,1.5) 4(-2.35,1) 5(-2.35,0.5) 6(-2.35,0) 7(-2.35,-0.5) 8(-2.35,-1) 9(-2.35,-1.5) 10(-2.35,-2) 11(-2.35,-2.5) 12(2.35,-2.5) 13(2.35,-2) 14(2.35,-1.5) 15(2.35,-1) 16(2.35,-0.5) 17(2.35,0) 18(2.35,0.5) 19(2.35,1) 20(2.35,1.5) 21(2.35,2) 22(2.35,2.5)
  rect 3.24x5.479 smd paste-2.727 mask+0.051: 23(0,0)
  silkscreen extent -2.65,-3.15 2.65,3.15, body extent -3.46,-3.5 3.46,3.5, height 0.25
FP-7914J-1-032-MFG [mm]
  rect 1.27x1.78 smd paste+0 mask+0: 1_1-(-1.27,1.905) 1_2+(1.27,1.905) 2_1-(-1.27,-1.905) 2_2+(1.27,-1.905)
  silkscreen extent -2.65,-2.65 2.65,3.57, body extent -2.75,-2.9 2.75,2.9, height 0.25
FUSE_3557-15 [mm]
  round 2.4 hole 1.6: 1_1(-6.735,1.7) 1_2(-6.735,-1.7) 2_1(6.735,1.7) 2_2(6.735,-1.7)
  silkscreen extent -9.9,-3.36 9.9,3.36, body extent -9.5,-3.52 10.31,3.21, height 3.14
IC_BNO085 [mm]
  rect 0.25x0.875 smd: 1(-2.25,1.66) 6(-2.25,-1.66) 7(-1.75,-1.66) 8(-1.25,-1.66) 9(-0.75,-1.66) 10(-0.25,-1.66) 11(0.25,-1.66) 12(0.75,-1.66) 13(1.25,-1.66) 14(1.75,-1.66) 15(2.25,-1.66) 20(2.25,1.66) 21(1.75,1.66) 22(1.25,1.66) 23(0.75,1.66) 24(0.25,1.66) 25(-0.25,1.66) 26(-0.75,1.66) 27(-1.25,1.66) 28(-1.75,1.66)
  rect 0.775x0.25 smd: 2(-2.412,0.75) 3(-2.412,0.25) 4(-2.412,-0.25) 5(-2.412,-0.75) 16(2.412,-0.75) 17(2.412,-0.25) 18(2.412,0.25) 19(2.412,0.75)
  silkscreen extent -2.81,-1.9 2.69,2.2, body extent -2.6,-1.9 2.6,1.9, height 1.18
IC_DRV8411APWPR [mm]
  rrect22% 1.5x0.45 smd paste-2 mask+0: 1(-2.9,2.275) 2(-2.9,1.625) 3(-2.9,0.975) 4(-2.9,0.325) 5(-2.9,-0.325) 6(-2.9,-0.975) 7(-2.9,-1.625) 8(-2.9,-2.275) 9(2.9,-2.275) 10(2.9,-1.625) 11(2.9,-0.975) 12(2.9,-0.325) 13(2.9,0.325) 14(2.9,0.975) 15(2.9,1.625) 16(2.9,2.275)
  rrect3% 3.4x5 smd paste-3 mask+0: 17(0,0)
  silkscreen extent -3,3.4 -2.8,3.6, body extent -3.2,-2.5 3.2,2.5, height 1.2
IC_TPS566231RQFR [mm]
  rrect25% 0.55x0.25 smd mask+0: 1(-0.925,0.5) 3(-0.925,-0.5)
  rrect40% 0.55x0.25 smd mask+0: 2(-0.925,0) 5(0.925,-0.5) 6(0.925,0) 7(0.925,0.5)
  rrect40% 0.25x1 smd mask+0: 4(-0.25,-0.45)
  rrect40% 0.25x1.3 smd mask+0: 8(0.25,0.3)
  rrect40% 0.25x0.55 smd mask+0: 9(-0.25,0.675)
  silkscreen extent -1.37,-0.94 1,1.09, body extent -1,-0.75 1,0.75, height 1
IND_SPM6530T-1R5M100 [mm]
  rect 1.85x3.4 smd: 1(-2.775,0) 2(2.775,0)
  silkscreen extent -3.55,-3.25 3.55,3.25, body extent -3.55,-3.25 3.55,3.25, height 3
LQFP64-10x10mm_STM [mm]
  rect 1.194x0.305 smd paste+0 mask+0: 1(-5.75,3.75) 2(-5.75,3.25) 3(-5.75,2.75) 4(-5.75,2.25) 5(-5.75,1.75) 6(-5.75,1.25) 7(-5.75,0.75) 8(-5.75,0.25) 9(-5.75,-0.25) 10(-5.75,-0.75) 11(-5.75,-1.25) 12(-5.75,-1.75) 13(-5.75,-2.25) 14(-5.75,-2.75) 15(-5.75,-3.25) 16(-5.75,-3.75) 33(5.75,-3.75) 34(5.75,-3.25) 35(5.75,-2.75) 36(5.75,-2.25) 37(5.75,-1.75) 38(5.75,-1.25) 39(5.75,-0.75) 40(5.75,-0.25) 41(5.75,0.25) 42(5.75,0.75) 43(5.75,1.25) 44(5.75,1.75) 45(5.75,2.25) 46(5.75,2.75) 47(5.75,3.25) 48(5.75,3.75)
  rect 0.305x1.194 smd paste+0 mask+0: 17(-3.75,-5.75) 18(-3.25,-5.75) 19(-2.75,-5.75) 20(-2.25,-5.75) 21(-1.75,-5.75) 22(-1.25,-5.75) 23(-0.75,-5.75) 24(-0.25,-5.75) 25(0.25,-5.75) 26(0.75,-5.75) 27(1.25,-5.75) 28(1.75,-5.75) 29(2.25,-5.75) 30(2.75,-5.75) 31(3.25,-5.75) 32(3.75,-5.75) 49(3.75,5.75) 50(3.25,5.75) 51(2.75,5.75) 52(2.25,5.75) 53(1.75,5.75) 54(1.25,5.75) 55(0.75,5.75) 56(0.25,5.75) 57(-0.25,5.75) 58(-0.75,5.75) 59(-1.25,5.75) 60(-1.75,5.75) 61(-2.25,5.75) 62(-2.75,5.75) 63(-3.25,5.75) 64(-3.75,5.75)
  silkscreen extent -6.93,-6.85 6.85,6.85, body extent -6,-6 6,6, height 1.6
MODULE_SC0195(9) [mil]
  rect 60x60 / inner round 60 / far side rect 60x60 hole 40: 1(-1343.7,914.57)
  round 60 hole 40: 2(-1343.7,1014.57) 3(-1243.7,914.57) 4(-1243.7,1014.57) 5(-1143.7,914.57) 6(-1143.7,1014.57) 7(-1043.7,914.57) 8(-1043.7,1014.57) 9(-943.7,914.57) 10(-943.7,1014.57) 11(-843.7,914.57) 12(-843.7,1014.57) 13(-743.7,914.57) 14(-743.7,1014.57) 15(-643.7,914.57) 16(-643.7,1014.57) 17(-543.7,914.57) 18(-543.7,1014.57) 19(-443.7,914.57) 20(-443.7,1014.57) 21(-343.7,914.57) 22(-343.7,1014.57) 23(-243.7,914.57) 24(-243.7,1014.57) 25(-143.7,914.57) 26(-143.7,1014.57) 27(-43.7,914.57) 28(-43.7,1014.57) 29(56.3,914.57) 30(56.3,1014.57) 31(156.3,914.57) 32(156.3,1014.57) 33(256.3,914.57) 34(256.3,1014.57) 35(356.3,914.57) 36(356.3,1014.57) 37(456.3,914.57) 38(456.3,1014.57) 39(556.3,914.57) 40(556.3,1014.57)
  round 244.09 hole 108.27: S1(-1535.43,964.57) S2(748.03,964.57) S3(748.03,-964.57) S4(-1535.43,-964.57)
PQFN50P250X300X86-14N [mm]
  rect 0.91x0.35 smd mask+0.05: 1(-1.31,0.75) 2(-1.31,0.25) 3(-1.31,-0.25) 4(-1.31,-0.75) 8(1.31,-0.75) 9(1.31,-0.25) 10(1.31,0.25) 11(1.31,0.75)
  rect 0.35x0.91 smd mask+0: 5(-0.5,-1.06) 6(0,-1.06) 7(0.5,-1.06) 12(0.5,1.06) 13(0,1.06) 14(-0.5,1.06)
  silkscreen extent -1.81,-1.3 1.55,1.6, body extent -1.5,-1.25 1.5,1.25, height 0.86
SAMTEC_TSW-101-23-G-T [mm]
  rect 1.37x1.37 hole 1.02: 01(0,0)
  round 1.37 hole 1.02: 02(0,2.54) 03(0,5.08)
  silkscreen extent -2.02,-1.27 1.27,6.35
Sip-3 [mm]
  rect 1.85x1.85 hole 0.85: 1(0,0)
  round 1.85 hole 0.85: 2(2.54,0) 3(5.08,0)
  silkscreen extent -2.54,-3.75 7.62,2, body extent -2.45,-3.4 7.45,2.35, height 7
Sip-4 [mm]
  rect 1.85x1.85 hole 0.85: 1(0,0)
  round 1.85 hole 0.85: 2(2.54,0) 3(5.08,0) 4(7.62,0)
  silkscreen extent -2.54,-3.75 10.16,2, body extent -2.45,-3.4 9.95,2.35, height 7
SIP-6 [mm]
  rect 1.85x1.85 hole 0.85: 1(0,0)
  round 1.85 hole 0.85: 2(2.52,0) 3(5.06,0) 4(7.62,0) 5(10.14,0) 6(12.68,0)
  silkscreen extent -2.56,-3.75 15.24,2, body extent -2.39,-3.32 15.01,2.43, height 7
SOP65P640X110-28N [mil]
  rect 58x14 smd: 1(-115,166) 2(-115,141) 3(-115,115) 4(-115,90) 5(-115,64) 6(-115,38) 7(-115,13) 8(-115,-13) 9(-115,-38) 10(-115,-64) 11(-115,-90) 12(-115,-115) 13(-115,-141) 14(-115,-166) 15(115,-166) 16(115,-141) 17(115,-115) 18(115,-90) 19(115,-64) 20(115,-38) 21(115,-13) 22(115,13) 23(115,38) 24(115,64) 25(115,90) 26(115,115) 27(115,141) 28(115,166)
  silkscreen extent -89,-193 89,193, body extent -126,-191 126,191, height 43
SOT95P285X140-5N [mm]
  rrect15% 1.35x0.6 smd: 1(-1.185,0.95) 2(-1.185,0) 3(-1.185,-0.95) 4(1.185,-0.95) 5(1.185,0.95)
  silkscreen extent -2.16,-1.55 2.16,2, body extent -1.4,-1.5 1.4,1.5, height 1.4
WE-HCC_807021 [mm]
  rect 2.3x3 smd: 1(-3.35,0) 2(3.35,0)
  silkscreen extent -4.2,-3.95 4.2,3.95, body extent -4.2,-3.95 4.2,3.95, height 7.15
X1-DFN1006-2_P6X1_DIO [mil]
  rect 12x22 smd paste+0 mask-1: 1(-13.5,0) 2(13.5,0)
  body extent -21,-14 21,14, height 21

## Part data
"ADC 1" "ADC 2" "ADC 3" "Sensor 1" "Sensor 2" "Sensor 3" "Sensor 4" "Sensor 5" "Servo 1" "Servo 2" "Servo 3" "Servo 4" "Servo 5" "Servo 6" "Servo 7" "Servo 8": library part CON3, "CON3"
"ADC Dif 1" "ADC Dif 2" "I2C 1" "I2C 2" Luefter: library part CON4, "CON4"
C100 C402 C406 C410 C414 C500 C501 C502: library part EEEFN1A220R, "CAP ALUM 22UF 20% 10V SMD", Package="RADIAL-2 Panasonic", Availability="In Stock", Check_prices=https://www.snapeda.com/parts/EEEFN1A220R/Panasonic/view-part/?ref=eda, MF=Panasonic, MP=EEEFN1A220R, Price=None, Purchase-URL=https://pricing.snapeda.com/search/part/EEEFN1A220R/?ref=eda, SnapEDA_Link=https://www.snapeda.com/parts/EEEFN1A220R/Panasonic/view-part/?ref=snap
C101 C102 C200 C201 C202 C300 C301 C400 C401 C403 C404 C411 C412 C505 C507 C509 C600 C601 Cboot600 Cbyp700 Cbyp710 Cbyp720 Ccap800 Ccap801 Cin600 Cin601 Cin700 Cin701 Cin702 Cin710 Cin711 Cin712 Cin720 Cin721 Cin722 Cinx600 Cinx700 Cinx710 Cinx720 Cout600 Cout601 Cout602 Cout603 Cout700 Cout701 Cout710 Cout711 Cout720 Cout721 Coutx600 Coutx700 Coutx710 Coutx720 Css600 Cstütz800 Cstütz801 Cstütz802 Cstütz803 Cstütz804 Cstütz805 Cstütz806 Cstütz807 Cvcc600 Cvcc700 Cvcc710 Cvcc720: library part KO, "Kondensator"
Cboot700 Cboot710 Cboot720 Ccomp700 Ccomp701 Ccomp702 Ccomp710 Ccomp711 Ccomp712 Ccomp720 Ccomp721 Ccomp722 Cff600 Csnubber700 Csnubber710 Csnubber720 Css700 Css710 Css720: library part VJ0402D100KXCAP, "Kondensator", Package=None, Availability=Unavailable, MP=VJ0402D100KXCAP, Price=None
F5: library part SICHERUNG, "SMD Fuse  / Voltage rating >6V / Current 7.5A / 1206", Text Field1=Strom
F6a F6b F6c: library part SICHERUNG, "SMD Fuse  / Voltage rating >6V / Current 12,5A / 1206", Text Field1=Strom
Fbat: "Auto Fuse Holder; THM; Insulated Clip; 30 Amp; Blue", Package=None, Check_prices=https://www.snapeda.com/parts/3557-15/Keystone/view-part/?ref=eda, MF="Keystone Electronics", MP=3557-15, SnapEDA_Link=https://www.snapeda.com/parts/3557-15/Keystone/view-part/?ref=snap
J1: "Plug; DC supply; XT60; male; PIN: 2; for cable; soldered; 30A; 500V", Package=Package, Check_prices=https://www.snapeda.com/parts/XT60-M/AMASS/view-part/?ref=eda, MF=AMASS, MP=XT60-M, SnapEDA_Link=https://www.snapeda.com/parts/XT60-M/AMASS/view-part/?ref=snap
L600: library part SPM6530T-1R5M100, "1.5µH Shielded Drum Core, Wirewound Inductor 11 A 10.67mOhm Max Nonstandard", Package="NON STANDARD-2 TDK", Check_prices=https://www.snapeda.com/parts/SPM6530T-1R5M100/TDK/view-part/?ref=eda, Digi-Key_Part_Number=445-3881-2-ND, MF=TDK, MP=SPM6530T-1R5M100, Purchase-URL=https://pricing.snapeda.com/search/part/SPM6530T-1R5M100/?ref=eda, SnapEDA_Link=https://www.snapeda.com/parts/SPM6530T-1R5M100/TDK/view-part/?ref=snap
L700 L710 L720: library part 7443340220, "7443340220 - Würth", Manufacturer_Name="Wurth Elektronik", Mouser Part Number=710-7443340220, Datasheet Link=https://www.we-online.com/components/products/download/3D_WE-HCC-8070_7443340xxx_3D+%28rev1%29.pdf, Height=7.2mm, Manufacturer_Part_Number=7443340220, Mouser Price/Stock=https://www.mouser.co.uk/ProductDetail/Wurth-Elektronik/7443340220?qs=MVRUG6Lt7nGtb48EAN9JeA%3D%3D
Moto1 Moto2 Moto3 Moto4 Moto5 Moto6: library part CON6, "CON6"
PCA9685PW/0x40: "LED Driver IC 16 Output Linear - PWM Dimming 25mA 28-TSSOP", Package="TSSOP-28 NXP Semiconductors", Check_prices=https://www.snapeda.com/parts/PCA9685PW,112/NXP+Semiconductors/view-part/?ref=eda, MF="NXP USA", MP=PCA9685PW,112, SnapEDA_Link=https://www.snapeda.com/parts/PCA9685PW,112/NXP+Semiconductors/view-part/?ref=snap
R200 R201 R202 R506 R507 R508 R509 R510 R511 R512 R513 R514 R519 R520 R521 R522 R523 R524 R525 R526 R529 R530 R531 R532 R535 R536 R537 R538 R800 Rcomp700 Rcomp701 Rcomp710 Rcomp711 Rcomp720 Rcomp721 Rfbb600 Rfbb700 Rfbb710 Rfbb720 Rfbt700 Rfbt710 Rfbt720 Rftb600 Rkelvin700 Rkelvin710 Rkelvin720 Roscet700 Roscet710 Roscet720 Rpgood700 Rpgood710 Rpgood720 Rramp700 Rramp710 Rramp720 Rsnubber700 Rsnubber710 Rsnubber720: library part RES, "Widerstand"
SWD_PROG: Package=None, Availability=Unavailable, MP=TSW-101-23-G-T, Price=None
T100: library part CMP-07427-000007-1, "SWITCH TACTILE SPST-NO 0.1A 16V", Case/Package=SMD/SMT, Current Rating=100mA, Max Operating Temperature=125°C, Min Operating Temperature=-55°C, Operating Force=300gf, Package Quantity=50, Voltage Rating (DC)=16V, Actuator Material=Rubber, Actuator Type=Standard, Contact Material=Gold, Contact Plating=Silver, Depth=5mm, Illumination Type=Non-Illuminated, Length=5mm, Max Current Rating=100mA, Mechanical Life=100000Cycles, Mount="Surface Mount", Orientation=Straight, Packaging=Rail/Tube, RoHS Compliant=Yes, Series=7914, Switch Function=Off-Mom, Termination=J-Hook, Throw Configuration=SPST
TVS1 TVS2 TVS3 TVS4 TVS5 TVS6 TVS7 TVS8 TVS9 TVS10 TVS11 TVS12 TVS13 TVS14 TVS15 TVS16: "TVS Diode", Manufacturer_Name="Diodes Inc", Copyright="Copyright (C) 2025 Ultra Librarian. All rights reserved.", Manufacturer_Part_Number=DRTR5V0U1LPQ-7B, RefDes=RefDes, Type=Type
U100: library part SC0195(9), "The Raspberry Pi 5 Model B", Package=None, Check_prices=https://www.snapeda.com/parts/SC0195(9)/Raspberry+Pi/view-part/?ref=eda, MF="Raspberry Pi", MP=SC0195(9), SnapEDA_Link=https://www.snapeda.com/parts/SC0195(9)/Raspberry+Pi/view-part/?ref=snap
U200: library part BNO085, "Accelerometer, Gyroscope, Magnetometer, 9 Axis Sensor IÂ²C, SPI, UART Output", Package="TFLGA-28 Hillcrest Laboratories", Check_prices=https://www.snapeda.com/parts/BNO085/Hillcrest+Laboratories%252C+Inc./view-part/?ref=eda, MF="Hillcrest Laboratories,", MP=BNO085, SnapEDA_Link=https://www.snapeda.com/parts/BNO085/Hillcrest+Laboratories%252C+Inc./view-part/?ref=snap
U300: library part LSM6DSOXTR, "Accelerometer, Gyroscope, 6 Axis Sensor I2C, SPI Output", Package="VFLGA-14 STMicroelectronics", Check_prices=https://www.snapeda.com/parts/LSM6DSOXTR/STMicroelectronics/view-part/?ref=eda, MF=STMicroelectronics, MP=LSM6DSOXTR, SnapEDA_Link=https://www.snapeda.com/parts/LSM6DSOXTR/STMicroelectronics/view-part/?ref=snap
U500 U501 U502: "1.65-V to 11-V, 4-A dual H-bridge motor driver with IPROPI current regulation", Package="TSSOP-16 Texas Instruments", Check_prices=https://www.snapeda.com/parts/DRV8411APWPR/Texas+Instruments/view-part/?ref=eda, MF="Texas Instruments", MP=DRV8411APWPR, SnapEDA_Link=https://www.snapeda.com/parts/DRV8411APWPR/Texas+Instruments/view-part/?ref=snap
U600: "Wandler IC", Package=None, Availability=Unavailable, MF="{'manufacturer': u'Texas Instruments'}", MP=TPS566231RQFR, Price=None
U601: "Linear Voltage Regulator IC Positive Fixed 1 Output 600mA SOT-25", Package="SOT-753 Diodes Inc.", Availability="In Stock", Check_prices=https://www.snapeda.com/parts/AP2112K-3.3TRG1/Diodes+Inc./view-part/?ref=eda, MF="Diodes Inc.", MP=AP2112K-3.3TRG1, Price=None, Purchase-URL=https://pricing.snapeda.com/search/part/AP2112K-3.3TRG1/?ref=eda, SnapEDA_Link=https://www.snapeda.com/parts/AP2112K-3.3TRG1/Diodes+Inc./view-part/?ref=snap
U700 U710 U720: "Wandler IC", Manufacturer="Texas Instruments", Copyright="Copyright (C) 2018 Accelerated Designs. All rights reserved", Manufacturer_Name="Texas Instruments", Manufacturer_Part_Number=TPS56121DQPR, PartNumber=TPS56121DQPR, RefDes=RefDes, Type=TYPE
U800: "High-performance, Arm Cortex-M33 with TrustZone, MCU with 2-Mbyte Flash, 640-Kbyte RAM, 250 MHz CPU", Manufacturer_Name=STMicroelectronics, Copyright="Copyright (C) 2025 Ultra Librarian. All rights reserved.", Datasheet=https://www.st.com/resource/en/datasheet/stm32h562ag.pdf, Manufacturer_Part_Number=STM32H562RIT6, RefDes=RefDes, Type=Type

## Via types
v1: diameter 0.7, hole 0.3, TOP1 to BOT4, tented both sides, 405 vias
v2: diameter 0.7, hole 0.3, TOP1 to BOT4, 57 vias

## Nets (pads, with @x,y where several pads share a name; then routed paths per layer and width w, separated by ;. In a path a pad name is that pad's centre, name@x,y a point inside that pad or via, vN(x,y) a via of type N, cw(c..) or ccw(c..) an arc to the next point about the centre after c; other vN are vias at no path point)
+3.3: "ADC 1.1" "ADC 2.1" "ADC 3.1" "ADC Dif 1.1" "ADC Dif 2.1" "I2C 1.1" "I2C 2.1" "Sensor 1.1" "Sensor 2.1" "Sensor 3.1" "Sensor 4.1" "Sensor 5.1" C200.1 C201.1 C300.1 C301.1 C400.2 C401.2 C601.2 Cstütz800.2 Cstütz801.2 Cstütz802.2 Cstütz803.2 Cstütz804.2 Cstütz805.2 Cstütz806.2 Cstütz807.2 PCA9685PW/0x40.28 R200.2 R201.2 R202.2 R506.2 U200.3 U200.28 U300.5 U300.8 U300.12 U601.5 U800.1 U800.13 U800.19 U800.32 U800.48 U800.64 | length 197.9
  TOP1 w0.3: 134.7,344.6 135.325,343.975 145.6,333.7 145.6,326.997 R506.2@146.9,325.697 ; 134.7,371.8 134.7,373.965 134.934,374.199 141.385,374.199 146.335,369.249 C601.2@152.225,369.249 ; 134.7,392.4 136.225,393.925 146.647,393.925 147.072,393.5 148.347,393.5 149.297,394.45 150.275,395.428 U800.32@150.275,396.537 ; 134.7,399.2 134.7,401.14 135.535,401.975 147.672,401.975 148,402.303 148.872,403.175 U800.19@150.275,403.175 ; 134.7,406 137.1,408.4 Cstütz803.2@153.45,408.4 ; U200.3@151.296,377.846 150.215,377.846 R202.2@149.666,378.395 ; U200.28@151.958,379.256 151.958,379.569 151.846,379.68 C200.1@151.846,380.989 ; Cstütz807.2@153.451,410.174 Cstütz803.2@153.451,408.4 ; Cstütz807.2@153.452,410.175 154.378,411.101 162.476,411.101 ; U800.13@153.775,406.175 153.775,407.219 153.45,407.544 Cstütz803.2@153.45,408.4 ; 157.325,411.071 157.325,409.605 157.966,408.964 157.966,408.681 Cstütz801.2@158.247,408.4 ; Cstütz801.2@158.022,408.4 Cstütz801.2@158.247,408.4 ; C301.1@158.85,382.376 158.639,382.587 158.263,382.587 156.85,384 152.757,384 151.846,383.089 C200.1@151.846,380.989 ; R201.2@159.475,375.802 157.7,375.802 156.916,375.018 156.916,373.251 154.175,370.51 154.175,370.135 153.111,370.135 C601.2@152.225,369.249 ; U800.48@159.775,394.675 159.775,393.123 160.498,392.4 160.498,385.664 162.407,383.755 162.325,383.673 162.325,382.215 162.275,382.165 162.275,381.529 161.325,380.579 161.325,379.817 161.275,379.767 159.883,379.767 158.91,380.74 158.91,382.358 159.141,382.127 159.709,382.127 159.981,381.855 160.465,381.855 U300.8@160.49,381.88 ; U800.1@159.775,405.952 159.778,405.95 Cstütz800.2@162.752,405.95 ; PCA9685PW/0x40.28@160.216,414.079 160.216,413.52 160.294,413.442 162.308,413.442 163.075,412.675 163.075,411.7 162.497,411.122 ; U800.64@161.775,404.175 161.775,404.974 Cstütz800.2@162.752,405.95 ; R202.2@149.666,378.395 148.7,377.429 148.7,372.774 C601.2@152.225,369.249 ; R202.2@149.666,378.395 149.666,379.666 150.989,380.989 C200.1@151.846,380.989 ; Cstütz801.2@158.247,408.4 159.801,408.4 161.026,407.175 161.527,407.175 Cstütz800.2@162.752,405.95
+5: C100.1 C101.2 C600.2 F5.2 Moto1.4 Moto2.4 Moto3.4 Moto4.4 Moto5.4 Moto6.4 U100.2 U100.4 U601.1 U601.3 | length 66.3
  TOP1 w0.4: Moto6.4@147.325,337.06 Moto5.4@153.575,337.06 Moto4.4@159.85,337.06 Moto3.4@166.1,337.06 Moto2.4@172.4,337.06 Moto1.4@178.65,337.06 181.75,340.16 181.75,352.5 180.25,354 180.25,360.561 F5.2@178.8,362.01 ; U601.1@154.175,367.765 154.275,367.865 154.275,368.684 154.509,368.918 155.693,368.918 155.975,368.636 155.975,367.865 156.075,367.765 159.699,367.765 C101.2@159.787,367.853
+6a: "Servo 1.2" "Servo 2.2" "Servo 3.2" "Servo 4.2" C402.1 C403.2 C406.1 C411.2 F6a.2
+6b: "Servo 5.2" "Servo 6.2" "Servo 7.2" "Servo 8.2" C404.2 C410.1 C412.2 C414.1 F6b.2
+6c: C500.1 C501.1 C502.1 C505.2 C507.2 C509.2 F6c.2 U500.1 U500.12 U501.1 U501.12 U502.1 U502.12
Battery: Cin600.2 Cin601.2 Cin700.1 Cin701.1 Cin702.1 Cin710.1 Cin711.1 Cin712.1 Cin720.1 Cin721.1 Cin722.1 Cinx600.2 Cinx700.1 Cinx710.1 Cinx720.1 Fbat.2_1 Fbat.2_2 Luefter.1 Rkelvin700.2 Rkelvin710.2 Rkelvin720.2 U600.5 U600.6 U700.12 U700.13 U700.14 U700.15 U700.16 U700.17 U710.12 U710.13 U710.14 U710.15 U710.16 U710.17 U720.12 U720.13 U720.14 U720.15 U720.16 U720.17
  other v1: 194.652,343.85 195.552,343.85 196.452,343.85 197.352,343.85 198.252,343.85 199.152,343.85 200.052,343.85 200.952,343.85 201.835,343.85 200,364.2 200.9,364.2 201.8,364.2 200,365.1 200.9,365.1 201.8,365.1 200,366 200.9,366 201.8,366 200,366.9 200.9,366.9 201.8,366.9 209.5,370 210.4,370 211.3,370 212.2,370 213.1,370 214,370 214.9,370 215.8,370 216.7,370 209.5,370.9 210.4,370.9 211.3,370.9 212.2,370.9 213.1,370.9 214,370.9 214.9,370.9 215.8,370.9 216.7,370.9 215.9,382.6 216.8,382.6 215.9,383.5 216.8,383.5 215.9,384.4 216.8,384.4 215.9,385.3 216.8,385.3 215.9,386.2 216.8,386.2 215.9,387.1 216.8,387.1 215.9,388 216.8,388 215.9,388.9 216.8,388.9 215.9,389.8 216.8,389.8 194.477,392.925 195.377,392.925 196.277,392.925 197.177,392.925 198.077,392.925 198.977,392.925 199.877,392.925 200.777,392.925 201.66,392.925 194.6,425.5 195.5,425.5 196.4,425.5 197.3,425.5 198.2,425.5 199.1,425.5 200,425.5 200.9,425.5 201.783,425.5